# Altium PCB ESCapeBoard.PcbDoc
Units mm, origin at the board's own origin, x right, y up, seen from the top; angles counter-clockwise.
Board outline 52 x 30 mm, 4 copper layers (Top Layer, Layer 1, Layer 2, Bottom Layer), stack 0.603 mm thick; 61 components, 53 nets, 200 pads, 126 vias.
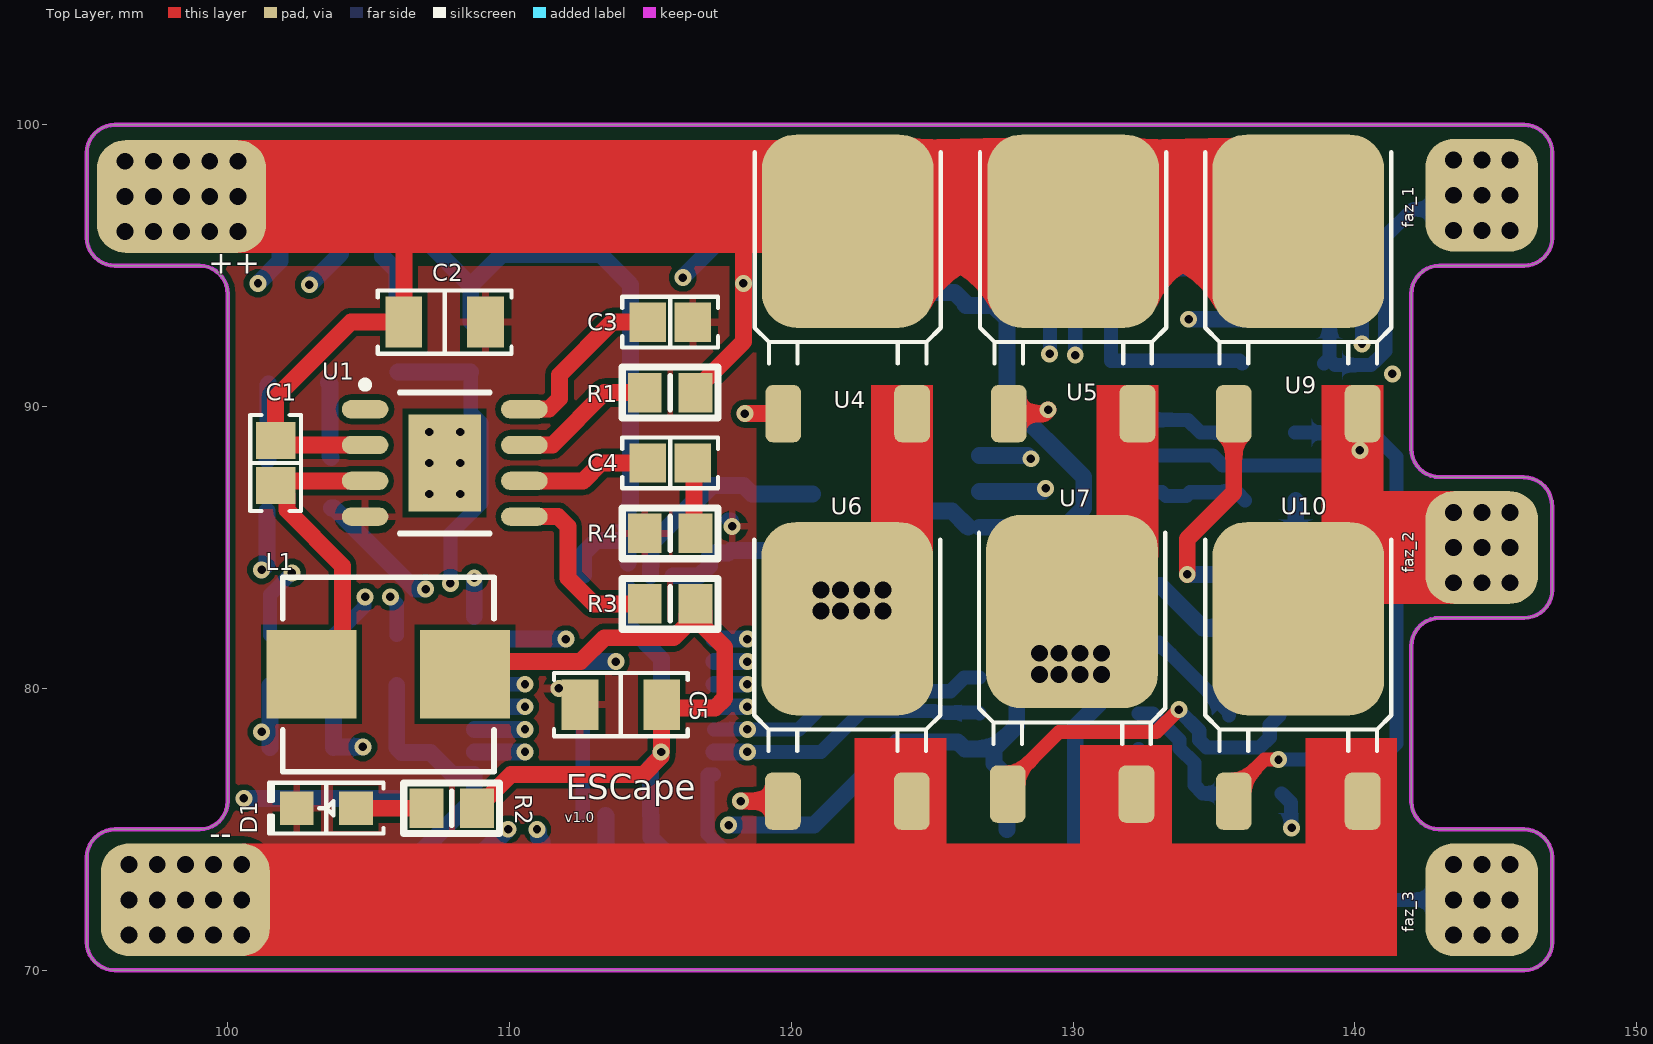
[diagram p0: Top Layer view]
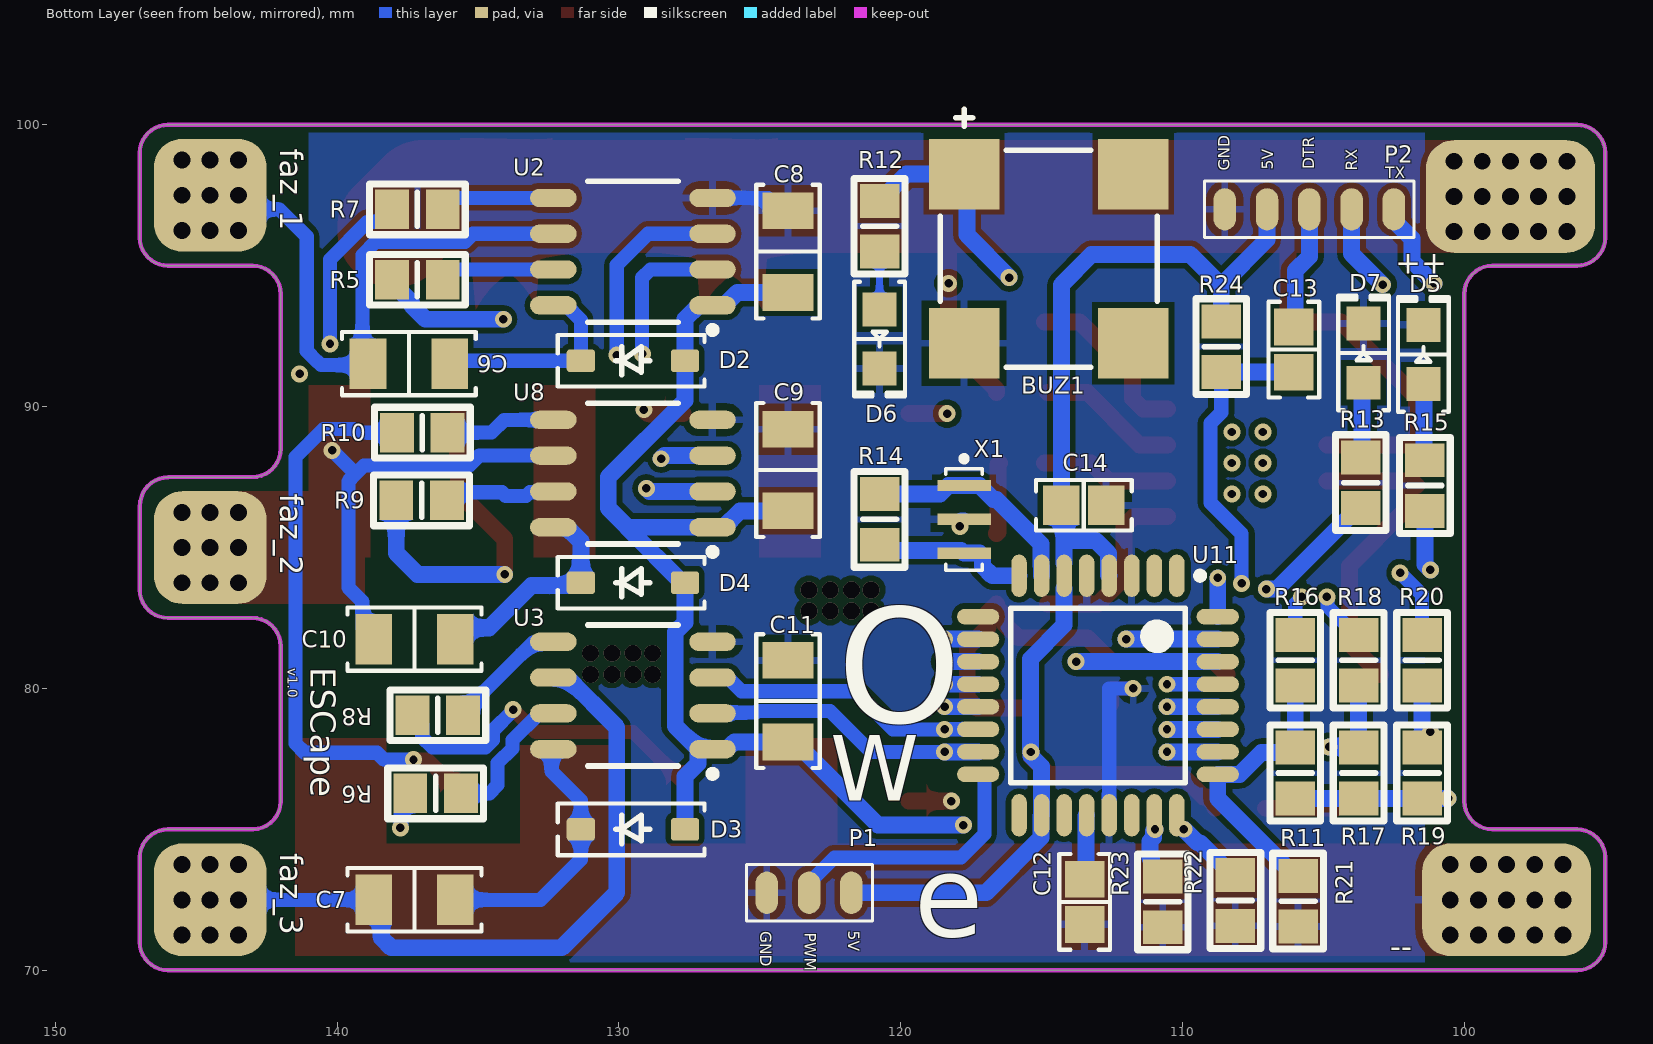
[diagram p1: Bottom Layer view, seen from below]
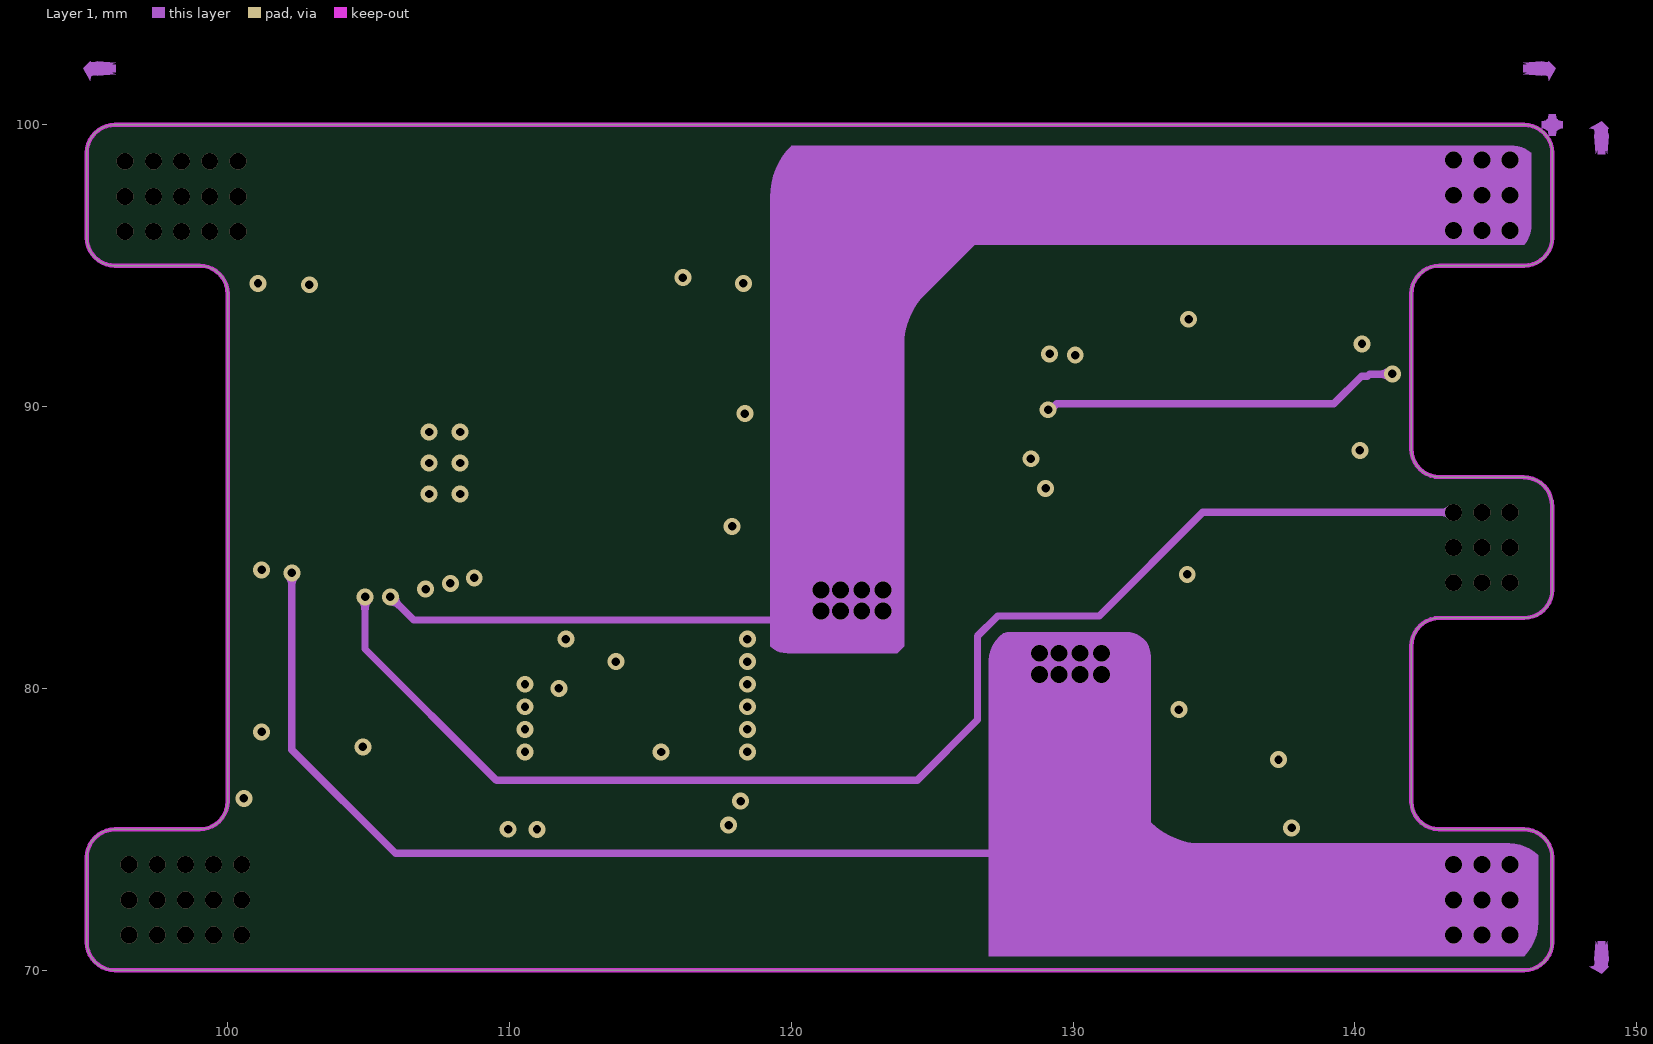
[diagram p2: Layer 1]
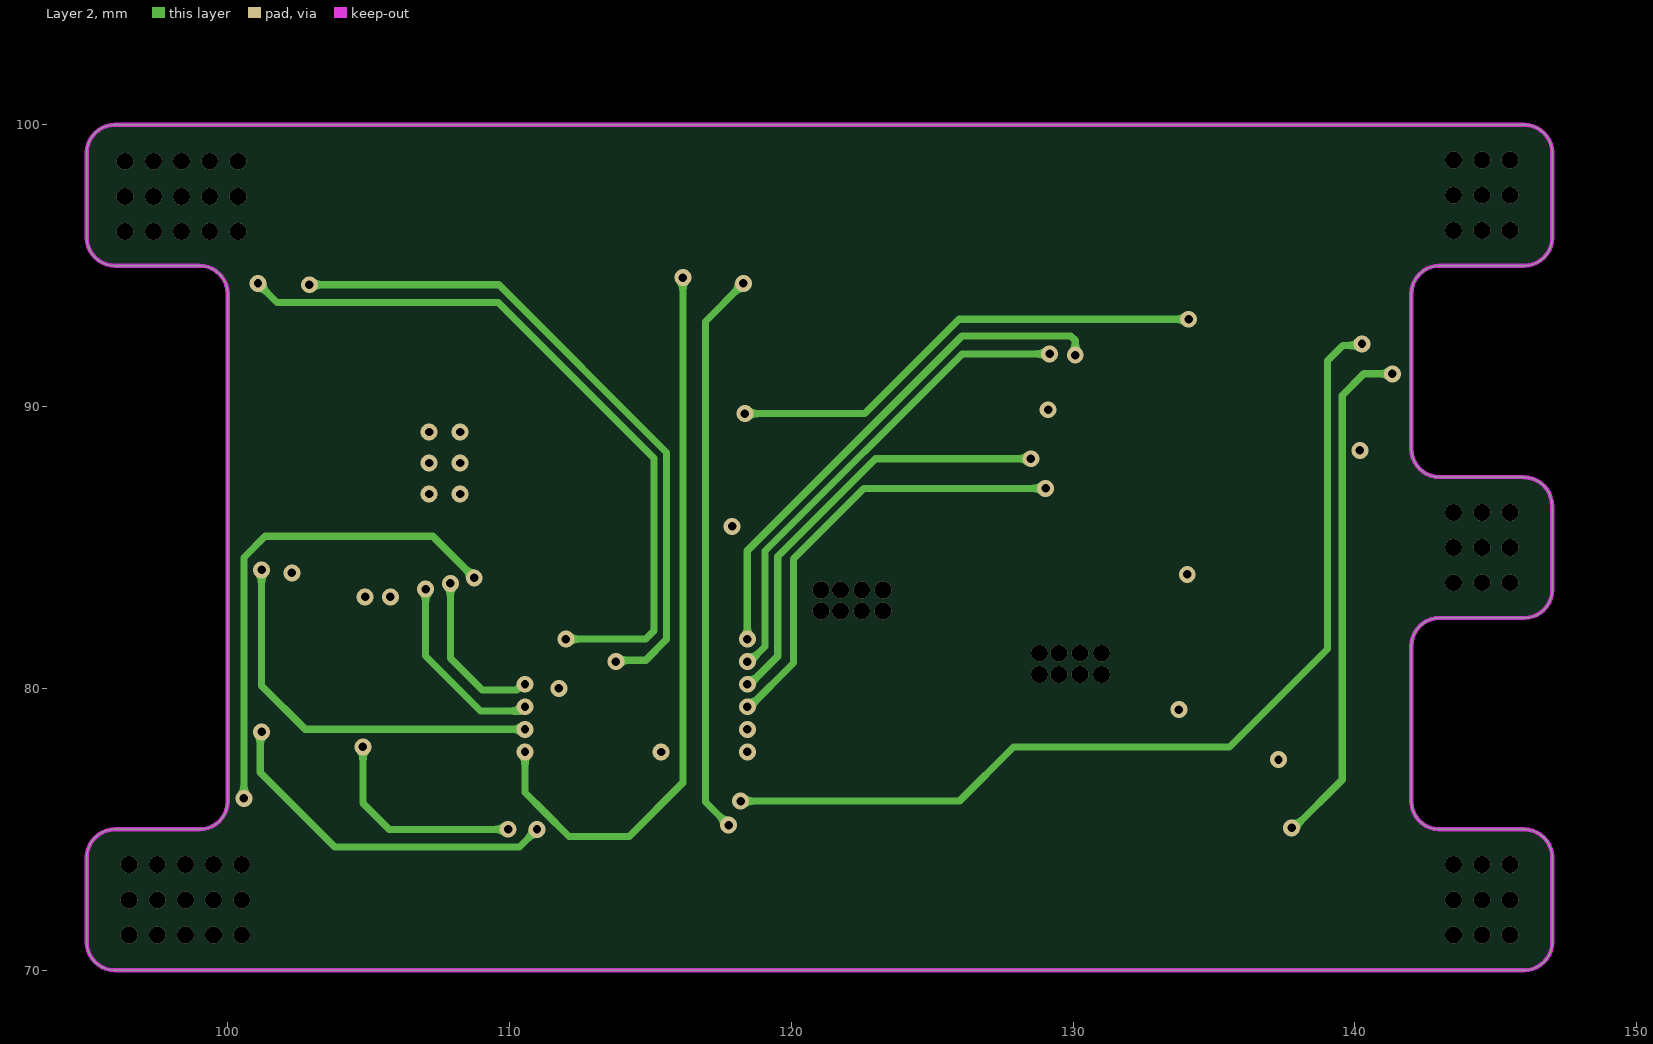
[diagram p3: Layer 2]
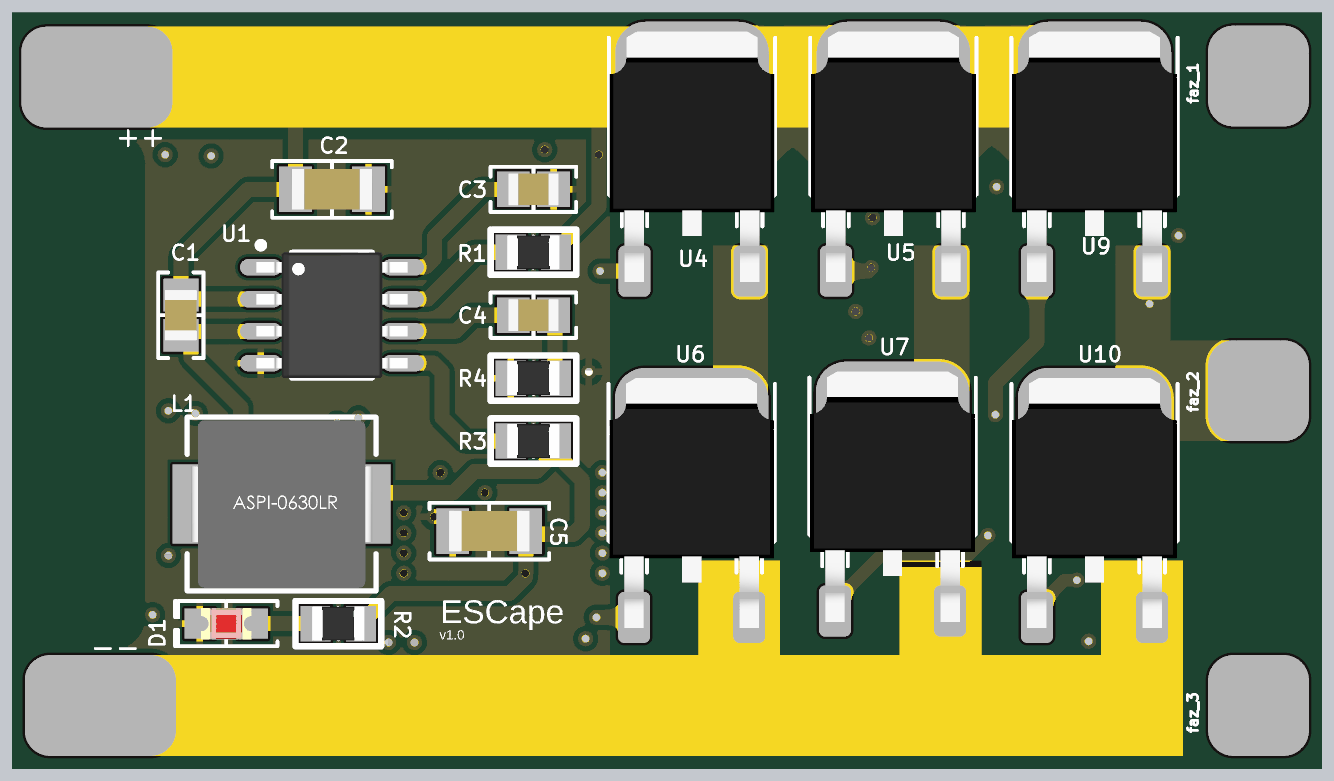
[diagram p4: 3D render of the assembled board from above, using the file's embedded part models]
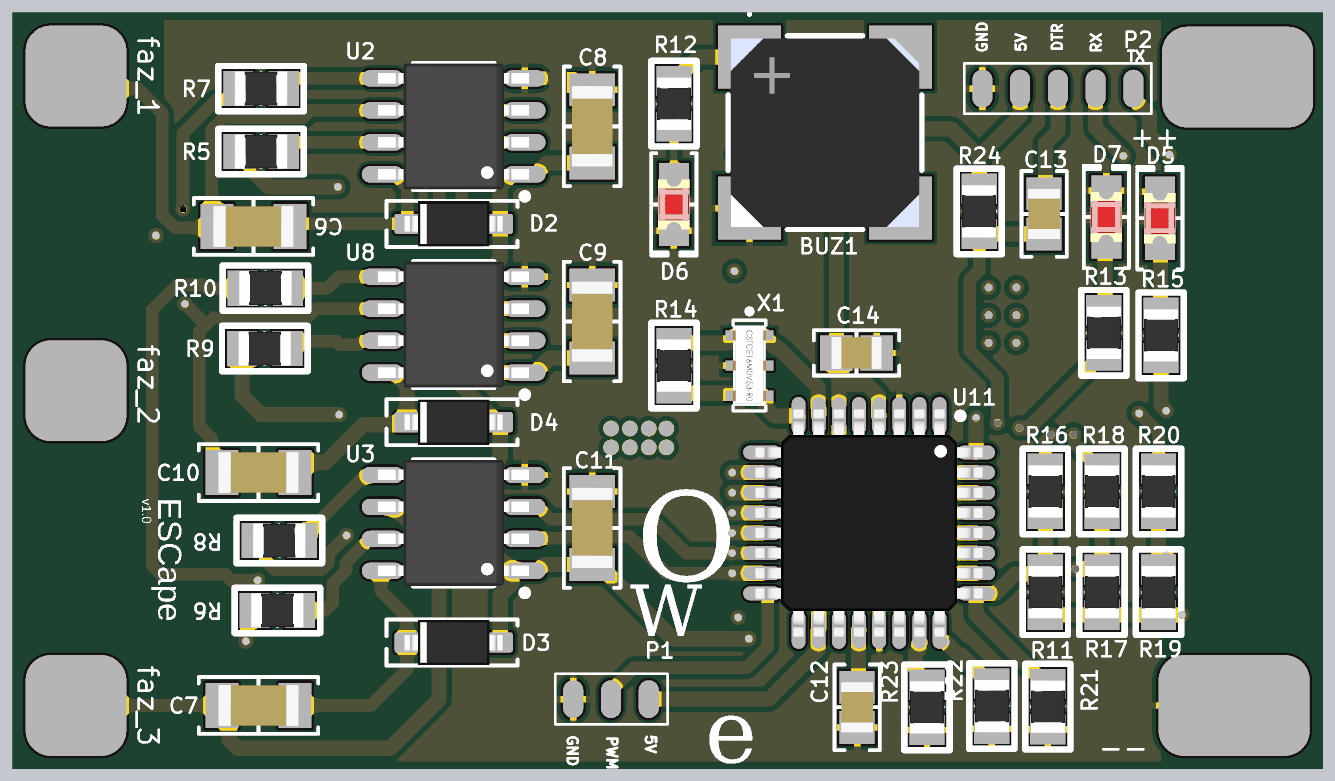
[diagram p5: 3D render of the assembled board from below, using the file's embedded part models]

## Layer stack, top to bottom
Top Solder: solder mask 0.0102, Solder Resist, Dk 3.5
Top Layer: signal copper 0.0356
Dielectric 2: prepreg 0.0711, PP-006, Dk 4.1
Layer 1: signal copper 0.035
Dielectric 1: dielectric 0.32, FR-4, Dk 4.8
Layer 2: signal copper 0.035
Dielectric 3: prepreg 0.0711, PP-006, Dk 4.1
Bottom Layer: signal copper 0.0356
Bottom Solder: solder mask 0.0102, Solder Resist, Dk 3.5

## Board outline
95,71 95,74 cw(c96,74) 96,75 99,75 ccw(c99,76) 100,76 100,94 ccw(c99,94) 99,95 96,95 cw(c96,96) 95,96 95,99 cw(c96,99) 96,100 146,100 cw(c146,99) 147,99 147,96 cw(c146,96) 146,95 143,95 ccw(c143,94) 142,94 142,88.501 ccw(c143,88.501) 143,87.501 143,87.5 145.991,87.5 145.991,87.491 cw(c145.991,86.491) 146.991,86.491 147,86.491 147,83.5 cw(c146,83.5) 146,82.5 143,82.5 ccw(c143,81.5) 142,81.5 142,75.976 ccw(c143,76) 142.976,75 146,75 cw(c146,74) 147,74 147,71 cw(c146,71) 146,70 96,70 cw(c96,71)

## Design rules (kind name [scope] priority, off if disabled: settings)
Clearance [All] p1: gap=0.2 ignorepadtopadclearanceinfootprint=FALSE except(0: Arc-Hole Track-Hole SMDPad-Hole THPad-Hole Via-Hole Fill-Hole Poly-Hole Region-Hole Text-Hole)
PolygonConnect [All] p1: connectstyle=Relief reliefconductorwidth=0.254 reliefentries=4 polygonreliefangle="90 Angle" airgapwidth=0.254
RoutingVias [All] p1: holewidth=0.3 width=0.6 viastyle="Through Hole" minholewidth=0.25 minwidth=0.5 maxholewidth=2.5 maxwidth=5
SolderMaskExpansion [All] p1: expansion=0.102 istentingtop=FALSE
SupplyNets "Schematic Supply Nets_2" [InNet('+5V')] p1: voltage=0.000
SupplyNets "Schematic Supply Nets_1" [InNet('GND')] p2: voltage=0.000
SupplyNets "Schematic Supply Nets" [InNet('VCC')] p3: voltage=0.000
Width [All] p1: maxlimit=10 minlimit=0.1 preferedwidth=0.3 midlayer1_minwidth=0.254 midlayer1_maxwidth=0.254 midlayer1_prefwidth=0.254 midlayer2_minwidth=0.254 midlayer2_maxwidth=0.254 midlayer2_prefwidth=0.254 minimp=50.000000 maximp=50.000000 favimp=50.000000
30 further rules are at their usual default settings.

## Classes and differential pairs
component class Power: C1 C2 C3 C4 C5 D1 L1 R1 R2 R3 R4 U1
component class MCU: BUZ1 C12 C13 C14 D5 D6 D7 P1 P2 R11 R12 R13 R14 R15 R16 R17 R18 R19 R20 R21 R22 R23 R24 U11 X1
component class Driver: C6 C7 C8 C9 C10 C11 D2 D3 D4 R5 R6 R7 R8 R9 R10 U2 U3 U4 U5 U6 U7 U8 U9 U10

## Components (designator, comment, footprint, x,y, rotation, side; value= is the part's Value field where it differs from the comment)
BUZ1 "BUZZER MAGN 3.6V 7.5X7.5MM SMD" "BUZ: CMT-7525" 114.75,95.25 r270 bottom
C1 "CAP CER 10000PF 50V X7R 0805" "CAP 0805/2012" 101.7,88 r270 top
C2 "CAP CER 10UF 50V X5R 1206" "CAP 1206/3216" 107.7,93 r180 top
C3 "CAP CER 0.1UF 50V X7R 0805" "CAP 0805/2012" 115.7,93 r180 top
C4 "CAP CER 3900PF 50V X7R 0805" "CAP 0805/2012" 115.7,88 r180 top
C5 "CAP CERAMIC 22UF 16V X7S 20% PAD" "CAP 1206/3216" 113.95,79.425 r0 top
C6 "CAP CER 2.2UF 50V X5R 1206" "CAP 1206/3216" 137.45,91.525 r0 bottom
C7 "CAP CER 2.2UF 50V X5R 1206" "CAP 1206/3216" 137.25,72.5 r0 bottom
C8 "CAP CER 10UF 50V X5R 1206" "CAP 1206/3216" 124,95.5 r270 bottom
C9 "CAP CER 10UF 50V X5R 1206" "CAP 1206/3216" 124,87.75 r270 bottom
C10 "CAP CER 2.2UF 50V X5R 1206" "CAP 1206/3216" 137.25,81.75 r0 bottom
C11 "CAP CER 10UF 50V X5R 1206" "CAP 1206/3216" 124,79.55 r270 bottom
C12 "CAP CER 0.1UF 50V X7R 0805" "CAP 0805/2012" 113.475,72.425 r270 bottom
C13 "CAP CER 0.1UF 50V X7R 0805" "CAP 0805/2012" 106.05,92.025 r270 bottom
C14 "CAP CER 0.1UF 50V X7R 0805" "CAP 0805/2012" 113.5,86.5 r180 bottom
D1 "Red 645nm LED Indication - Discrete 1.8V 0805" "SMD: LED 0805/2012 RED" 103.5,75.75 r180 top
D2 "1N4148 Diyot" SOD-123 129.5,91.629 r0 bottom
D3 "1N4148 Diyot" SOD-123 129.5,75 r0 bottom
D4 "1N4148 Diyot" SOD-123 129.5,83.75 r0 bottom
D5 "Red 645nm LED Indication - Discrete 1.8V 0805" "SMD: LED 0805/2012 RED" 101.45,91.85 r90 bottom
D6 "Red 645nm LED Indication - Discrete 1.8V 0805" "SMD: LED 0805/2012 RED" 120.75,92.4 r270 bottom
D7 "Red 645nm LED Indication - Discrete 1.8V 0805" "SMD: LED 0805/2012 RED" 103.575,91.9 r90 bottom
L1 "FIXED IND 10UH 4A 68 MOHM SMD" ASPI-0630LR-100M-T15 105.7,80.5 r0 top
P1 "WR-PHD 2.54 mm Angled Socket Header" PWM_CONN 123.25,72.75 r0 bottom
P2 "WR-PHD 2.54 mm Angled Socket Header" TTL_CONN_5 105.5,97 r0 bottom
R1 "RES SMD 100K OHM 1% 1/8W 0805" RES_0805 115.7,90.5 r0 top
R2 "RES SMD 100 OHM 1% 1/8W 0805" RES_0805 107.95,75.75 r180 top
R3 "RES SMD 44.2K OHM 1% 1/8W 0805" RES_0805 115.7,83 r0 top
R4 "RES SMD 6.8K OHM 1% 1/8W 0805" RES_0805 115.7,85.5 r0 top
R5 "RES SMD 100 OHM 1% 1/8W 0805" RES_0805 137.15,94.5 r0 bottom
R6 "RES SMD 100 OHM 1% 1/8W 0805" RES_0805 136.5,76.275 r0 bottom
R7 "RES SMD 100 OHM 1% 1/8W 0805" RES_0805 137.15,97 r0 bottom
R8 "RES SMD 100 OHM 1% 1/8W 0805" RES_0805 136.425,79.05 r0 bottom
R9 "RES SMD 100 OHM 1% 1/8W 0805" RES_0805 137,86.675 r0 bottom
R10 "RES SMD 100 OHM 1% 1/8W 0805" RES_0805 136.975,89.075 r0 bottom
R11 "RES SMD 33K OHM 1% 1/8W 0805" RES_0805 106,77 r90 bottom
R12 "RES SMD 100 OHM 1% 1/8W 0805" RES_0805 120.75,96.4 r90 bottom
R13 "RES SMD 100 OHM 1% 1/8W 0805" RES_0805 103.675,87.3 r90 bottom
R14 "RES SMD 10K OHM 1% 1/8W 0805" RES_0805 120.75,86 r270 bottom
R15 "RES SMD 100 OHM 1% 1/8W 0805" RES_0805 101.4,87.2 r90 bottom
R16 "RES SMD 33K OHM 1% 1/8W 0805" RES_0805 106,81 r90 bottom
R17 "RES SMD 33K OHM 1% 1/8W 0805" RES_0805 103.75,77 r90 bottom
R18 "RES SMD 33K OHM 1% 1/8W 0805" RES_0805 103.75,81 r90 bottom
R19 "RES SMD 33K OHM 1% 1/8W 0805" RES_0805 101.5,77 r90 bottom
R20 "RES SMD 33K OHM 1% 1/8W 0805" RES_0805 101.5,81 r90 bottom
R21 "RES SMD 10K OHM 1% 1/8W 0805" RES_0805 105.9,72.45 r90 bottom
R22 "RES SMD 10K OHM 1% 1/8W 0805" RES_0805 108.125,72.475 r90 bottom
R23 "RES SMD 10K OHM 1% 1/8W 0805" RES_0805 110.7,72.425 r90 bottom
R24 "RES SMD 10K OHM 1% 1/8W 0805" RES_0805 108.625,92.125 r90 bottom
U1 "IC REG BUCK ADJUSTABLE 3A 8SOIC" SOIC8_PAD 107.7,88 r0 top
U2 "IC GATE DRVR HALF-BRIDGE 8SOIC" SOIC8 129.5,95.5 r0 bottom
U3 "IC GATE DRVR HALF-BRIDGE 8SOIC" SOIC8 129.5,79.75 r0 bottom
U4 "MOSFET N-CH 30V 161A DPAK" DPAK 122.014,93.75 r90 top
U5 "MOSFET N-CH 30V 161A DPAK" DPAK 130.014,93.75 r90 top
U6 "MOSFET N-CH 30V 161A DPAK" DPAK 122,80 r90 top
U7 "MOSFET N-CH 30V 161A DPAK" DPAK 129.978,80.25 r90 top
U8 "IC GATE DRVR HALF-BRIDGE 8SOIC" SOIC8 129.5,87.625 r0 bottom
U9 "MOSFET N-CH 30V 161A DPAK" DPAK 138,93.75 r90 top
U10 "MOSFET N-CH 30V 161A DPAK" DPAK 138,80 r90 top
U11 "IC MCU 8BIT 32KB FLASH 32TQFP" TQFP32 113,79.75 r270 bottom
X1 "CERAMIC RES 16.0000MHZ 15PF SMD" CRYSTAL_16MHZ(CTSE16) 117.75,86 r270 bottom

## Footprints (in the part's own frame and the unit in brackets; to place one, negate y for a bottom-side part, rotate by r counter-clockwise, add the part's x,y. Pads: shape width x height; smd on the part's side, far side on the other; paste and mask are expansions set on the pad)
ASPI-0630LR-100M-T15 [mm]
  rect 3.2x3.15 smd: 1(-2.725,0) 2(2.725,0)
  silkscreen extent -3.75,-3.45 3.75,3.45, body extent -3.6,-3.32 3.6,3.33, height 3
"BUZ: CMT-7525" [mm]
  rect 2.5x2.5 smd: 0(-3,3) 0(3,3) 1(-3,-3) 2(3,-3)
  silkscreen extent -5.3,-3.85 3.85,3.85, body extent -3.75,-3.75 3.75,3.75, height 2.5
"CAP 0805/2012" [mm] "Chip Capacitor, 2-Leads, Body 2.00x1.20mm, IPC Medium Density"
  rect 1.3x1.4 smd: 1(-0.8,0) 2(0.8,0)
  silkscreen extent -1.7,-0.9 1.7,0.9, body extent -1,-0.64 1,0.64, height 1.26
"CAP 1206/3216" [mm] "Chip Capacitor, 2-Leads, Body 3.25x1.60mm, IPC Medium Density"
  rect 1.3x1.8 smd: 1(-1.45,0) 2(1.45,0)
  silkscreen extent -2.37,-1.12 2.37,1.12, body extent -1.6,-0.81 1.6,0.81, height 1.62
CRYSTAL_16MHZ(CTSE16) [mm]
  rect 0.4x1.9 smd: 1(-1.2,0) 2(0,0) 3(1.2,0)
  silkscreen extent -2.25,-0.65 1.8,0.65, body extent -1.6,-0.65 1.6,0.65, height 0.9
DPAK [mil] "D-PAK, 3-Pads, Body 6,47x6,54mm (max), IPC Medium Density"
  rrect40% 80x50 smd: 1(-157.48,90.55) 3(-157.48,-89.45)
  rrect40% 270x240 smd: 4(97.52,0.55)
  silkscreen extent -87,-129 208,131, body extent -174,-128 217,129, height 91
PWM_CONN [mm]
  oval 0.8x1.5 smd: 1(-1.5,0) 2(0,0) 3(1.5,0)
  silkscreen extent -2.25,-1 2.22,1
RES_0805 [mm]
  rect 1.2x1.4 smd: 1(-0.9,0) 2(0.9,0)
  silkscreen extent -1.7,-0.9 1.7,0.9, body extent -1.05,-0.68 1.05,0.68, height 0.6
"SMD: LED 0805/2012 RED" [mm] "Chip Diode, 2-Leads, Body 2.00x1.25mm, IPC Medium Density"
  rect 1.2x1.2 smd: 1(-1.05,0) 2(1.05,0)
  silkscreen extent -2.03,-0.9 2.03,0.9, body extent -1,-0.62 1,0.63, height 0.9
SOD-123 [mm] "SOD, 2-Leads, Body 1.55x3.70mm, IPC Medium Density"
  rrect25% 1x0.8 smd: 1(-1.85,0) 2(1.85,0)
  silkscreen extent -2.54,-0.92 2.67,0.92, body extent -1.95,-0.9 1.95,0.9, height 1.18
SOIC8 [mm] "SOIC, 8-Leads, Body 4,90x3,90mm, Pitch 1,27mm, Thermal Pad 3,45x2,56mm, IPC Low Density"
  oval 1.65x0.65 smd: 1(-2.825,1.905) 2(-2.825,0.635) 3(-2.825,-0.635) 4(-2.825,-1.905) 5(2.825,-1.905) 6(2.825,-0.635) 7(2.825,0.635) 8(2.825,1.905)
  silkscreen extent -2.95,-2.5 1.6,2.9, body extent -3,-2.5 3,2.5, height 1.7
SOIC8_PAD [mm] "SOIC, 8-Leads, Body 4,90x3,90mm, Pitch 1,27mm, Thermal Pad 3,45x2,56mm, IPC Low Density"
  oval 1.65x0.65 smd: 1(-2.825,1.905) 2(-2.825,0.635) 3(-2.825,-0.635) 4(-2.825,-1.905) 5(2.825,-1.905) 6(2.825,-0.635) 7(2.825,0.635) 8(2.825,1.905)
  rect 2.56x3.45 smd: 9(0,0)
  silkscreen extent -2.95,-2.5 1.6,2.9, body extent -3,-2.5 3,2.5, height 1.7
TQFP32 [mm] "TQFP, 32-Leads, Body 7,00x7,00mm, Pitch 0,80mm, IPC Medium Density"
  oval 1.5x0.55 smd: 1(-4.25,2.8) 2(-4.25,2) 3(-4.25,1.2) 4(-4.25,0.4) 5(-4.25,-0.4) 6(-4.25,-1.2) 7(-4.25,-2) 8(-4.25,-2.8) 17(4.25,-2.8) 18(4.25,-2) 19(4.25,-1.2) 20(4.25,-0.4) 21(4.25,0.4) 22(4.25,1.2) 23(4.25,2) 24(4.25,2.8)
  oval 0.55x1.5 smd: 9(-2.8,-4.25) 10(-2,-4.25) 11(-1.2,-4.25) 12(-0.4,-4.25) 13(0.4,-4.25) 14(1.2,-4.25) 15(2,-4.25) 16(2.8,-4.25) 25(2.8,4.25) 26(2,4.25) 27(1.2,4.25) 28(0.4,4.25) 29(-0.4,4.25) 30(-1.2,4.25) 31(-2,4.25) 32(-2.8,4.25)
  silkscreen extent -4.37,-3.1 3.1,3.75, body extent -4.51,-4.51 4.51,4.51, height 1
TTL_CONN_5 [mm]
  oval 0.8x1.5 smd: 1(-3,0) 2(-1.5,0) 3(0,0) 4(1.5,0) 5(3,0)
  silkscreen extent -3.71,-1 3.72,1

## Part data
BUZ1: library part Buzzer(CMT-7525-80-SMT-TR), "Buzzers Transducer, Externally Driven Magnetic 3.6V 100mA 2.73kHz 80dB @ 3.6V, 10cm Surface Mount Solder Pads", +Sicaklik=+85, -Sicaklik=-40, Cins=Buzzer, Deger=Buzzer, Kılıf=Nonstandard, Lehim Yöntemi=SMD, MSL="1 (Unlimited)", Uretici Kodu=CMT-7525-80-SMT-TR
C1: library part "10nF 50V 0805", "10000pF ±10% 50V Ceramic Capacitor X7R 0805 (2012 Metric)", +Sicaklik=+125, -Sicaklik=-55, Cins=Kondansator, Deger="10nF 50V", Kılıf=0805, Lehim Yöntemi=SMD, MSL="1 (Unlimited)", Uretici Kodu=CL21B103KBANNNC
C2 C8 C9 C11: library part "10uF 50V 1206", "10µF ±10% 50V Ceramic Capacitor X5R 1206 (3216 Metric)", +Sicaklik=+125, -Sicaklik=-55, Cins=Kondansator, Deger="10uF 50V", Kılıf=1206, Lehim Yöntemi=SMD, MSL="1 (Unlimited)", Uretici Kodu=CL31A106KBHNNNE
C3 C12 C13 C14: library part "100nF 50V 0805", "0.1µF ±10% 50V Ceramic Capacitor X7R 0805 (2012 Metric)", +Sicaklik=+125, -Sicaklik=-55, Cins=Kondansator, Deger="100nF 50V", Kılıf=0805, Lehim Yöntemi=SMD, MSL="1 (Unlimited)", Uretici Kodu=CL21B104KBCNNNC
C4: library part "3.9nF 50V 0805", "3900pF ±10% 50V Ceramic Capacitor X7R 0805 (2012 Metric)", +Sicaklik=+125, -Sicaklik=-55, Cins=Kondansator, Deger="3.9nF 50V", Kılıf=0805, Lehim Yöntemi=SMD, MSL="1 (Unlimited)", Uretici Kodu=CL21B392KBANNNC
C5: library part "22uF 16V 1206", "22µF ±20% 16V Ceramic Capacitor X7S 1206 (3216 Metric)", +Sicaklik=+125, -Sicaklik=-55, Cins=Kondansator, Deger="22uF 16V", Kılıf=1206, Lehim Yöntemi=SMD, MSL="1 (Unlimited)", Uretici Kodu=GRM31CC71C226ME11L
C6 C7 C10: library part "2.2uF 50V 1206", "2.2µF ±10% 50V Ceramic Capacitor X5R 1206 (3216 Metric)", +Sicaklik=+85, -Sicaklik=-55, Cins=Kondansator, Deger="2.2uF 50V", Kılıf=1206, Lehim Yöntemi=SMD, MSL="1 (Unlimited)", Uretici Kodu=CL31A225KBHNNNE
D1 D5 D6 D7: library part LED_Kırmızı, "LED RED DIFFUSED 0805 SMD", +Sicaklik=+125, -Sicaklik=-40, Cins=LED, Deger="KIRMIZI LED", Kılıf=0805, Lehim Yöntemi=SMD, MSL="1 (Unlimited)", Uretici Kodu="LH R974-LP-1"
D2 D3 D4: library part 1N4148, "DIODE GEN PURP 100V 150MA SOD123", +Sicaklik=+150, -Sicaklik=-65, Cins=Diyot, Deger=1N4148, Kılıf=SOD123, Lehim Yöntemi=SMD, MSL="1 (Unlimited)", Uretici Kodu=1N4148W-TP
L1: library part "10uH 4A", "10µH Shielded Molded Inductor 4A 68mOhm Max Nonstandard", +Sicaklik=+125, -Sicaklik=-55, Cins=Bobin, Deger="10uH 4A", Kılıf=Nonstandard, Lehim Yöntemi=SMD, MSL="1 (Unlimited)", Uretici Kodu=ASPI-0630LR-100M-T15
P1: library part HDR(1X3), +Sicaklik=+105, -Sicaklik=-40, Cins=Konnektor, Kılıf="3POS 2.54MM", Lehim Yöntemi=MANUEL, MSL="1 (Unlimited)", Uretici Kodu=613003143121
P2: library part HDR(1X5), +Sicaklik=+105, -Sicaklik=-40, Cins=Konnektor, Kılıf="5POS 2.54MM", Lehim Yöntemi=MANUEL, MSL="1 (Unlimited)", Uretici Kodu=613005143121
R1: library part "100K 0805", "100 kOhms ±1% 0.125W, 1/8W Chip Resistor 0805 (2012 Metric) Moisture Resistant Thick Film", +Sicaklik=+155, -Sicaklik=-55, Cins=Direnc, Deger=100K, Kılıf=0805, Lehim Yöntemi=SMD, MSL="1 (Unlimited)", Uretici Kodu=RC0805FR-07100KL
R2 R5 R6 R7 R8 R9 R10 R12 R13 R15: library part "100R 0805", "100 Ohms ±1% 0.125W, 1/8W Chip Resistor 0805 (2012 Metric) Moisture Resistant Thick Film", +Sicaklik=+155, -Sicaklik=-55, Cins=Direnc, Deger=100R, Kılıf=0805, Lehim Yöntemi=SMD, MSL="1 (Unlimited)", Uretici Kodu=RC0805FR-07100RL
R3: library part "44.2K 0805", "44.2 kOhms ±1% 0.125W, 1/8W Chip Resistor 0805 (2012 Metric) Moisture Resistant Thick Film", +Sicaklik=+155, -Sicaklik=-55, Cins=Direnc, Deger=44.2K, Kılıf=0805, Lehim Yöntemi=SMD, MSL="1 (Unlimited)", Uretici Kodu=RC0805FR-0744K2L
R4: library part "6.8K 0805", "6.8 kOhms ±1% 0.125W, 1/8W Chip Resistor 0805 (2012 Metric) Moisture Resistant Thick Film", +Sicaklik=+155, -Sicaklik=-55, Cins=Direnc, Deger=6.8K, Kılıf=0805, Lehim Yöntemi=SMD, MSL="1 (Unlimited)", Uretici Kodu=RC0805FR-076K8L
R11 R16 R17 R18 R19 R20: library part "33K 0805", "33 kOhms ±1% 0.125W, 1/8W Chip Resistor 0805 (2012 Metric) Moisture Resistant Thick Film", +Sicaklik=+155, -Sicaklik=-55, Cins=Direnc, Deger=33K, Kılıf=0805, Lehim Yöntemi=SMD, MSL="1 (Unlimited)", Uretici Kodu=RC0805FR-0733KL
R14 R21 R22 R23 R24: library part "10K 0805", "10 kOhms ±1% 0.125W, 1/8W Chip Resistor 0805 (2012 Metric) Moisture Resistant Thick Film", +Sicaklik=+155, -Sicaklik=-55, Cins=Direnc, Deger=10K, Kılıf=0805, Lehim Yöntemi=SMD, MSL="1 (Unlimited)", Uretici Kodu=RC0805FR-0710KL
U1: library part MP2307DN, "Buck Switching Regulator IC Positive Adjustable 0.925V 1 Output 3A 8-SOIC (0.154\", 3.90mm Width) Exposed Pad", +Sicaklik=+85, -Sicaklik=-40, Cins=IC, Deger=MP2307DN, Kılıf=8-SOIC, Lehim Yöntemi=SMD, MSL="2A (4 Weeks)", Uretici Kodu=MP2307DN-LF-Z
U2 U3 U8: library part IR2101, "Half-Bridge Gate Driver IC Non-Inverting 8-SOIC", +Sicaklik=+150, -Sicaklik=-40, Cins=IC, Deger=IR2101STRPBF, Kılıf=8-SOIC, Lehim Yöntemi=SMD, MSL="2A (4 Weeks)", Uretici Kodu=IR2101STRPBF
U4 U5 U6 U7 U9 U10: library part IRLR7843, "N-Channel 30V 161A (Tc) 140W (Tc) Surface Mount D-Pak", +Sicaklik=+175, -Sicaklik=-55, Cins=MOSFET, Deger=IRLR7843TRPBF, Kılıf=DPAK(TO-252-3), Lehim Yöntemi=SMD, MSL="1 (Unlimited)", Uretici Kodu=IRLR7843TRPBF
U11: library part ATMEGA328P, "AVR AVR® ATmega Microcontroller IC 8-Bit 20MHz 32KB (16K x 16) FLASH 32-TQFP (7x7)", +Sicaklik=+85, -Sicaklik=-40, Cins=IC, Deger=ATMEGA328P, Kılıf=32-TQFP, Lehim Yöntemi=SMD, MSL="3 (168 Hours)", Uretici Kodu=RC0805FR-07100RL
X1: library part "CRYSTAL 16.0000MHZ(CSTCE16M0V53-R0)", "16MHz Ceramic Resonator Built in Capacitor 15pF ±0.3%  -20°C ~ 80°C Surface Mount", +Sicaklik=+80, -Sicaklik=-20, Cins=Kristal, Deger="16 MHZ 15PF", Kılıf=3-SMD, Lehim Yöntemi=SMD, MSL="1 (Unlimited)", Uretici Kodu=CSTCE16M0V53-R0

## Free pads (board coordinates)
  rrect50% 6x4 smd: ""(98.362,97.458) ""(98.5,72.5)
  rrect50% 6x4 smd far side: ""(98.362,97.458) ""(98.5,72.5)
  rrect50% 4x4 smd: ""(144.5,72.5) ""(144.5,85) ""(144.5,97.5)
  rrect50% 4x4 smd far side: ""(144.5,72.5) ""(144.5,85) ""(144.5,97.5)

## Via types
v1: diameter 0.6, hole 0.6, Top Layer to Bottom Layer, 57 vias
v2: diameter 0.6, hole 0.3, Top Layer to Bottom Layer, tented both sides, 53 vias
v3: diameter 0.6, hole 0.6, Top Layer to Bottom Layer, tented both sides, 16 vias

## Nets (pads, with @x,y where several pads share a name; then routed paths per layer and width w, separated by ;. In a path a pad name is that pad's centre, name@x,y a point inside that pad or via, vN(x,y) a via of type N, cw(c..) or ccw(c..) an arc to the next point about the centre after c; other vN are vias at no path point)
+5V: C5.2 C14.1 L1.2 P1.1 P2.4 R2.1 R3.2 R24.2 U11.4 U11.6 U11.18 | length 65.6
  Top Layer w0.6: L1.2 108.875,80.95 112.525,80.95 113.375,81.8 115.825,81.8 116.3,82.275 116.3,82.6 116.488,82.788 116.812,82.788 R3.2 ; R2.1 108.85,75.85 109.15,76.15 109.25,76.15 110.05,76.95 114.75,76.95 115.381,77.581 v2(115.381,77.744) 115.4,77.763 C5.2 115.525,79.3 117.287,79.3 117.638,79.651 117.638,81.447 116.9,82.185 R3.2@116.9,82.7
  Bottom Layer w0.6: P2.4 107,95.925 108.625,94.3 ; R24.2 108.625,94.3 ; U11.4 112.625,84.025 112.625,84.796 113.079,85.25 114.15,85.25 114.2,85.2 ; U11.6@114.2,83.55 114.2,82.25 115.4,81.05 115.4,77.763 v2(115.381,77.744) 115.381,77.608 115,77.227 U11.18 115.025,75.475 115.025,74.704 116.979,72.75 P1.1 ; U11.6@114.2,84.45 114.2,85.2 ; 108.625,94.3 109.725,95.4 113.225,95.4 114.3,94.325 C14.1 114.2,86.4 114.2,85.2
A0: R19.2 R20.1 R23.2 U11.23 | length 16.9
  Layer 2 w0.254: v2(101.202,78.456) 101.155,78.409 101.155,77.02 103.8,74.375 110.35,74.375 v2(110.975,75)
  Bottom Layer w0.6: v2(101.202,78.456) 101.5,78.456 R19.2 ; 101.5,78.64 R20.1 ; R23.2@110.725,73.35 110.825,73.35 111.1,73.625 111.1,73.926 111.15,73.976 111.15,74.579 111.025,74.704 111.025,74.95 v2(110.975,75)
A1: R17.2 R18.1 R22.2 U11.24 | length 13.3
  Layer 2 w0.254: v2(104.8,77.923) 104.8,75.925 105.725,75 v2(109.948,75.002) v2(109.948,75.002)
  Bottom Layer w0.6: R17.2 R17.2@103.75,77.923 ; R18.1 R17.2@103.75,77.923 ; v2(104.8,77.923) R17.2@103.75,77.923 ; R22.2 108.225,73.375 109.374,74.524 109.469,74.524 v2(109.948,75.002)
A2: R11.2 R16.1 R21.2 U11.25 | length 10.2
  Bottom Layer w0.6: R21.2 106,73.35 108.75,76.1 U11.25 107.979,76.95 107.201,77.728 106.172,77.728 R11.2 106,79.177 R16.1
BUZZ: BUZ1.1 R12.2 U11.26 | length 36
  Layer 2 w0.254: v2(110.55,77.75) 110.55,76.311 111.234,75.627 112.111,74.75 114.25,74.75 116.15,76.65 v2(116.15,94.575)
  Bottom Layer w0.6: U11.26 v2(110.55,77.75) ; v2(116.15,94.575) 116.15,94.6 117.65,96.1 117.65,98.15 BUZ1.1 119.8,98.25 120.35,97.7 120.35,97.6 120.65,97.3 R12.2
DTR: C13.1 P2.3 | length 4.4
  Bottom Layer w0.6: P2.3 105.5,95.325 106,94.825 106,92.875 C13.1
FAZ_1: C6.2 pad.@144.5,97.5 R16.2 U2.6 U4.3 U6.4 | length 36.1
  Layer 1 w0.254: v2(105.775,83.25) 106.6,82.425 119.592,82.425
  Bottom Layer w0.5: v2(105.775,83.25) 105.775,83.223 106,82.998 R16.2 ; U2.6 135.179,96.135 135.464,95.85 138.636,95.85 139.1,95.386 139.1,91.725 C6.2@138.982,91.607 ; C6.2 C6.2@138.982,91.607 ; v1(143.5,97.5) 143.001,97.001 142.043,97.001 141.075,96.033 141.075,91.975 140.707,91.607 140.693,91.607 140.561,91.475 139.3,91.475 139.168,91.607 C6.2@138.982,91.607
  other v1: 143.5,96.25 144.5,96.25 145.5,96.25 144.5,97.5 145.5,97.5 143.5,98.75 144.5,98.75 145.5,98.75
  other v3: 121.05,82.75 121.75,82.75 122.5,82.75 123.25,82.75 121.05,83.5 121.75,83.5 122.5,83.5 123.25,83.5
FAZ_2: C10.2 pad.@144.5,85 R18.2 U8.6 U9.3 U10.4 | length 64.8
  Layer 1 w0.254: v2(104.875,83.25) 104.875,81.4 109.533,76.742 124.467,76.742 126.6,78.875 126.6,81.85 127.325,82.575 130.925,82.575 134.6,86.25 v1(143.5,86.25)
  Bottom Layer w0.5: R18.2 103.768,81.9 104.118,82.25 104.2,82.25 104.856,82.906 104.856,83.231 v2(104.875,83.25) ; U8.6 133.639,88.26 134.954,88.26 135.307,87.906 139.044,87.906 139.322,87.628 ; C10.2 139.1,82.15 139.1,83.077 139.6,83.577 139.6,87.35 139.322,87.628 ; v2(140.175,88.45) 139.353,87.628 139.322,87.628
  other v1: 143.5,83.75 144.5,83.75 145.5,83.75 143.5,85 144.5,85 145.5,85 144.5,86.25 145.5,86.25
FAZ_3: C7.2 pad.@144.5,72.5 R20.2 U3.6 U5.3 U7.4 | length 62.2
  Layer 1 w0.254: v2(102.275,84.1) 102.275,77.825 105.95,74.15 129.699,74.15
  Bottom Layer w0.5: R20.2 101.5,83.325 v2(102.275,84.1) ; C7.2 v1(143.5,72.5)
  Bottom Layer w0.6: U3.6 131.839,80.385 130.075,78.621 130.075,72.75 132.025,70.8 138.074,70.8 138.426,71.151 138.426,72.226 C7.2
  other v1: 143.5,71.25 144.5,71.25 145.5,71.25 144.5,72.5 145.5,72.5 143.5,73.75 144.5,73.75 145.5,73.75
  other v3: 128.8,80.5 129.5,80.5 130.25,80.5 131,80.5 128.8,81.25 129.5,81.25 130.25,81.25 131,81.25
GND: BUZ1.2 C2.1 C3.1 C5.1 C8.1 C9.1 C11.1 C12.2 C14.2 D1.2 D5.2 D6.2 D7.2 P1.3 P2.5 pad.@98.5,72.5 R4.1 R21.1 R22.1 R23.1 U1.4 U2.4 U3.4 U6.3 U7.3 U8.4 U10.3 U11.3 U11.5 U11.21 X1.2 | length 9.9
  Top Layer w0.5: v2(111.75,80) 112.5,80 C5.1
  Bottom Layer w0.5: v2(111.75,80) 112.6,80 U11.21 ; X1.2 117.85,86 117.9,85.95 v2(117.9,85.75) ; C8.1 124.25,96.95 124.705,97.405 U2.4
  other v1: 96.5,71.25 97.5,71.25 98.5,71.25 99.5,71.25 100.5,71.25 96.5,72.5 97.5,72.5 98.5,72.5 99.5,72.5 100.5,72.5 96.5,73.75 97.5,73.75 98.5,73.75 99.5,73.75 100.5,73.75
H_1: U2.2 U11.11 | length 23.7
  Layer 2 w0.254: v2(118.438,80.95) 118.525,80.95 119.065,81.49 119.065,84.873 126.062,91.87 v2(129.167,91.87)
  Bottom Layer w0.5: U2.2 128.882,94.865 129.175,94.572 129.175,91.878 v2(129.167,91.87)
  Bottom Layer w0.6: U11.11 v2(118.438,80.95)
H_2: U8.2 U11.13 | length 19.5
  Layer 2 w0.254: v2(118.438,79.35) 118.525,79.35 120.075,80.9 120.075,84.599 122.576,87.1 v2(129.025,87.1)
  Bottom Layer w0.6: U11.13 v2(118.438,79.35) ; U8.2 128.915,86.99 v2(129.025,87.1)
H_3: U3.2 U11.15 | length 10.1
  Bottom Layer w0.5: v2(118.438,77.75) 121.051,77.75 122.501,79.2 125.086,79.2 125.143,79.144 126.646,79.144 U3.2
  Bottom Layer w0.6: U11.15 v2(118.438,77.75)
L_1: U2.3 U11.10 | length 26.8
  Layer 2 w0.254: v2(118.438,81.75) 118.438,84.888 126.05,92.5 129.926,92.5 130.075,92.351 v2(130.075,91.825)
  Bottom Layer w0.5: U2.3 128.965,96.135 130.075,95.025 v2(130.075,91.825)
  Bottom Layer w0.6: U11.10 v2(118.438,81.75)
L_2: U8.3 U11.12 | length 18.5
  Layer 2 w0.254: v2(118.438,80.15) 118.525,80.15 119.519,81.144 119.519,84.685 122.984,88.15 v2(128.5,88.15)
  Bottom Layer w0.6: U11.12 v2(118.438,80.15) ; U8.3 128.39,88.26 v2(128.5,88.15)
L_3: U3.3 U11.14 | length 10.2
  Bottom Layer w0.5: U11.14 v2(118.438,78.55) 120.275,78.55 121.625,79.9 125.649,79.9 126.134,80.385 U3.3
LED_1: R15.1 U11.27 | length 18.1
  Layer 2 w0.254: v2(101.202,84.204) 101.202,80.098 102.75,78.55 v2(110.55,78.55)
  Bottom Layer w0.6: v2(101.202,84.204) 101.4,84.402 R15.1 ; U11.27 v2(110.55,78.55)
LED_2: R13.1 U11.28 | length 13.1
  Layer 2 w0.254: v2(107.024,83.526) 107.024,81.151 108.975,79.2 110.306,79.2 110.456,79.35 v2(110.55,79.35)
  Bottom Layer w0.6: R13.1 103.775,86.4 106.649,83.526 v2(107.024,83.526) ; U11.28 v2(110.55,79.35)
NetC1_1: U1.1
NetC1_2: C1.2 L1.1 U1.3 | length 11.4
  Top Layer w0.6: L1.1@103,80.5 L1.1 104.075,81.6 104.075,84.35 102.1,86.325 102.1,86.85 101.75,87.2 C1.2 101.855,87.355 104.865,87.355 U1.3
NetC3_2: C3.2 U1.8 | length 6.2
  Top Layer w0.6: U1.8 110.535,89.915 111.408,89.915 111.775,90.281 111.775,91.128 113.647,93 C3.2
NetC4_1: C4.1 R4.2 | length 2.5
  Top Layer w0.6: C4.1 116.55,87.95 116.55,85.55 R4.2
NetC4_2: C4.2 U1.6 | length 4.6
  Top Layer w0.6: U1.6 112.615,87.365 113.25,88 C4.2
NetC6_1: C6.1 D2.2 U2.8 | length 7.3
  Bottom Layer w0.5: U2.8 131.866,93.595 131.35,93.079 D2.2 135.896,91.629 C6.1
NetC7_1: C7.1 D3.2 U3.8 | length 9.4
  Bottom Layer w0.5: U3.8 132.388,77.782 132.388,77.063 131.35,76.025 131.35,73.925 132.775,72.5 C7.1
NetC10_1: C10.1 D4.2 U8.8 | length 8
  Bottom Layer w0.6: U8.8 131.839,85.72 131.35,85.231 D4.2 131.45,83.65 133.1,83.65 134.601,82.149 135.45,82.149 135.8,81.799 C10.1
NetC12_1: C12.1 U11.20 | length 2.3
  Bottom Layer w0.6: U11.20 113.425,75.475 113.425,73.275 C12.1
NetD1_1: D1.1 R2.2 | length 2.5
  Top Layer w0.6: D1.1 R2.2
NetD5_1: D5.1 R15.2 | length 2.7
  Bottom Layer w0.6: R15.2 101.425,88.125 101.425,90.775 D5.1
NetD6_1: D6.1 R12.1 | length 2.1
  Bottom Layer w0.254: D6.1 R12.1
NetD7_1: D7.1 R13.2 | length 2.7
  Bottom Layer w0.6: D7.1 103.625,90.8 103.625,88.25 R13.2
NetR1_1: R1.1 U1.7 | length 5
  Top Layer w0.6: U1.7 110.535,88.645 111.52,88.645 113.375,90.5 R1.1
NetR3_1: R3.1 U1.5 | length 6.6
  Top Layer w0.6: U1.5 111.725,86.095 112.076,85.744 112.076,83.924 113,83 R3.1
NetR5_1: R5.1 U2.7 | length 4.1
  Bottom Layer w0.5: U2.7 135.9,94.865 136.25,94.515 R5.1
NetR5_2: R5.2 U4.1 | length 23.2
  Top Layer w0.6: v2(118.35,89.75) U4.1
  Layer 2 w0.254: v2(118.35,89.75) 122.6,89.75 125.95,93.1 v2(134.1,93.1)
  Bottom Layer w0.6: v2(134.1,93.1) 136.857,93.1 137.35,93.593 137.35,93.7 138.05,94.4 R5.2
NetR6_1: R6.1 U3.7 | length 5.1
  Bottom Layer w0.5: U3.7 132.825,79.115 133.775,78.165 133.775,77.874 134.3,77.349 134.3,76.568 134.593,76.275 R6.1
NetR6_2: R6.2 U5.1 | length 33.8
  Top Layer w0.6: U5.1 128.975,89.75 v2(129.114,89.889)
  Layer 1 w0.254: v2(129.114,89.889) 129.208,89.889 129.419,90.1 139.25,90.1 140.229,91.079 140.446,91.079 140.517,91.15 141.31,91.15 v2(141.325,91.164)
  Layer 2 w0.254: v2(137.75,75.05) 137.837,75.05 139.548,76.761 139.548,90.398 140.314,91.164 v2(141.325,91.164)
  Bottom Layer w0.5: R6.2 137.731,75.944 137.731,75.069 v2(137.75,75.05)
NetR7_1: R7.1 U2.5 | length 4.1
  Bottom Layer w0.5: U2.5 135.9,97.405 136.25,97.055 R7.1
NetR7_2: R7.2 U6.1 | length 42.3
  Top Layer w0.6: v2(118.2,76) U6.1
  Layer 2 w0.254: v2(118.2,76) 125.959,76 127.88,77.921 135.546,77.921 139.025,81.4 139.025,91.625 139.569,92.169 140.194,92.169 v2(140.25,92.225)
  Bottom Layer w0.5: R7.2 138.05,96.9 138.4,96.55 138.926,96.55 140.25,95.226 v2(140.25,92.225)
NetR8_1: R8.1 U3.5 | length 4.3
  Bottom Layer w0.5: U3.5 132.354,81.626 133.049,81.626 135.525,79.15 R8.1
NetR8_2: R8.2 U7.1 | length 12.6
  Top Layer w0.5: U7.1 127.678,76.631 129.497,78.45 132.95,78.45 v2(133.75,79.25)
  Bottom Layer w0.5: v2(133.75,79.25) 133.75,79.223 134.475,78.499 134.475,78.164 134.739,77.9 136.614,77.9 136.975,78.261 136.975,78.7 R8.2
NetR9_1: R9.1 U8.7 | length 4
  Bottom Layer w0.5: U8.7 132.354,86.961 133.153,86.961 133.289,86.825 134.014,86.825 134.15,86.961 135.814,86.961 R9.1
NetR9_2: R9.2 U9.1 | length 12.4
  Top Layer w0.6: v2(134.05,84.05) 134.05,85.3 135.7,86.95 U9.1
  Bottom Layer w0.6: v2(134.05,84.05) 137.15,84.05 137.9,84.8 R9.2
NetR10_1: R10.1 U8.5 | length 3.9
  Bottom Layer w0.5: U8.5 134.068,89.53 134.523,89.075 R10.1
NetR10_2: R10.2 U10.1 | length 21.1
  Top Layer w0.5: U10.1 135.7,76.381 136.791,77.472 137.283,77.472 v2(137.286,77.475)
  Bottom Layer w0.5: v2(137.286,77.475) 138.341,77.475 138.586,77.719 141.144,77.719 141.475,78.05 141.475,88.211 140.486,89.2 139.418,89.2 139.293,89.075 R10.2
PD2: R11.1 R17.1 R19.1 U11.32 | length 24.4
  Layer 2 w0.254: v2(100.575,76.1) 100.575,84.649 101.326,85.4 107.275,85.4 v2(108.75,83.925)
  Bottom Layer w0.6: v2(100.575,76.1) R19.1 R17.1 R11.1 ; U11.32 v2(108.75,83.925)
PWM: P1.2 U11.16 | length 9.6
  Bottom Layer w0.5: U11.16 117.048,76.95 117.025,76.927 117.025,74.839 117.866,73.998 122.352,73.998 123.25,73.1 P1.2
RESET: C13.2 R24.1 U11.29 | length 18.3
  Layer 2 w0.254: v2(107.9,83.725) 107.9,81.075 109.025,79.95 110.256,79.95 110.456,80.15 v2(110.55,80.15)
  Bottom Layer w0.5: v2(107.9,83.725) 107.9,85.489 109,86.589 109,89.411 108.625,89.786 R24.1 ; U11.29 v2(110.55,80.15)
  Bottom Layer w0.6: C13.2 R24.1
RX: P2.2 U11.30 | length 32.1
  Layer 2 w0.254: v2(102.9,94.325) 109.625,94.325 115.575,88.375 115.575,81.742 114.833,81 113.825,81 v2(113.775,80.95)
  Bottom Layer w0.6: v2(102.9,94.325) 104,95.425 P2.2 ; U11.30 v2(113.775,80.95)
TX: P2.1 U11.31 | length 32.5
  Layer 2 w0.254: v2(101.075,94.375) 101.752,93.698 109.598,93.698 115.121,88.175 115.121,82.037 114.834,81.75 v2(112,81.75)
  Bottom Layer w0.6: v2(101.075,94.375) 101.862,95.162 101.862,95.958 102.5,96.596 P2.1 ; U11.31 v2(112,81.75)
VCC: C1.1 C2.2 C8.2 C9.2 C11.2 D2.1 D3.1 D4.1 pad.@98.362,97.458 R1.2 U1.2 U2.1 U3.1 U4.4 U5.4 U8.1 U9.4 | length 122.3
  Top Layer w0.6: U1.2 104.865,88.645 101.855,88.645 C1.1 101.7,90.325 104.375,93 C2.2 106.25,97.379 106.172,97.458 ; R1.2 116.6,90.6 118.302,92.302 118.302,94.373 v2(118.3,94.375) 118.302,94.377 118.302,97.458
  Top Layer w4: v1(100.362,97.458) 106.172,97.458 118.302,97.458 136.938,97.458 137.986,96.41 U9.4
  Layer 2 w0.254: v2(117.775,75.15) 116.95,75.975 116.95,93.025 v2(118.3,94.375)
  Bottom Layer w0.6: v2(117.775,75.15) 120.8,75.15 123.75,78.1 C11.2 125.906,78.1 126.161,77.845 U3.1 127.175,77.845 128,78.67 128,81.997 127.65,82.347 D4.1 ; C9.2 125.698,86.3 U8.1@126.278,85.72 ; C8.2 125.8,94.05 126.165,93.685 126.165,93.618 126.189,93.595 U2.1 127.161,93.595 127.65,93.106 D2.1 127.65,90.222 130.375,87.497 130.375,86.4 129.695,85.72 U8.1 ; U3.1@127.161,77.845 127.185,77.822 127.185,77.335 127.65,76.87 D3.1 ; D4.1@127.75,83.75 129.678,85.678
  other v1: 96.362,96.208 97.362,96.208 98.362,96.208 99.362,96.208 100.362,96.208 96.362,97.458 97.362,97.458 98.362,97.458 99.362,97.458 96.362,98.708 97.362,98.708 98.362,98.708 99.362,98.708 100.362,98.708
X1: R14.1 U11.7 X1.1 | length 7.8
  Bottom Layer w0.6: U11.7 115,84.331 115.025,84.356 115.025,85.132 116.593,86.7 116.7,86.7 117.2,87.2 X1.1 118.3,87.2 118.6,86.9 R14.1
X2: R14.2 U11.8 X1.3 | length 5.6
  Bottom Layer w0.6: U11.8 116.749,84 117.1,84.351 117.1,84.7 117.2,84.8 X1.3 117.85,84.9 120.55,84.9 R14.2
pads on no net: BUZ1.0 U1.9 U11.1 U11.2 U11.9 U11.17 U11.19 U11.22
copper on no net:
  other v2: 107.15,86.9 108.25,86.9 107.15,88 108.25,88 107.15,89.1 108.25,89.1

## Polygon pours and split planes (outlines as drawn)
GND on Bottom Layer "GND_L04_P000" (solid, remove dead copper, pour order 0): 101.4,100 141,100 141,70 101.4,70
GND on Top Layer "GND_L01_P003" (solid, remove dead copper, pour order 3): 99.194,94.976 118.75,94.976 118.75,73.75 99.098,73.75 99.098,94.995

## Keep-outs
Keep-Out Layer:
  lines w0.15: 143,87.5 145.991,87.5 ; 143,87.501 cw(c143,88.501) 142,88.501 142,94 cw(c143,94) 143,95 146,95 ccw(c146,96) 147,96 147,99 ccw(c146,99) 146,100 96,100 ccw(c96,99) 95,99 95,96 ccw(c96,96) 96,95 99,95 cw(c99,94) 100,94 100,76 cw(c99,76) 99,75 96,75 ccw(c96,74) 95,74 95,71 ccw(c96,71) 96,70 146,70 ccw(c146,71) 147,71 147,74 ccw(c146,74) 146,75 145.984,75 142.976,75 cw(c143,76) 142,75.976 142,81.5 cw(c143,81.5) 143,82.5 146,82.5 ccw(c146,83.5) 147,83.5 147,86.491 ; 145.991,87.491 cw(c145.991,86.491) 146.991,86.491

## Other copper
Top Layer:
  rectangle net FAZ_2: 139,83 144.75,87
  rectangle net FAZ_3: 130.825,84.65 133.025,90.775
  rectangle net GND: 130.25,70.5 133.5,78
  rectangle net GND: 138.25,70.5 141.5,78.25
  rectangle net GND: 122.25,70.5 125.5,78.25
  rectangle net GND: 100.5,70.5 141.5,74.5
  rectangle net FAZ_1: 122.825,84.65 125.025,90.775
  rectangle net FAZ_2: 138.811,84.65 141.011,90.775
Layer 1:
  region net FAZ_1: 124,81.5 124,92.198 cw(c126.54,92.198) 124.744,93.994 126.5,95.75 146,95.75 ccw(c145.396,96.354) 146.25,96.354 146.25,99 ccw(c145.646,98.396) 145.646,99.25 120,99.25 119.994,99.244 ccw(c121.79,97.448) 119.25,97.448 119.25,81.5 ccw(c119.854,82.104) 119.854,81.25 123.75,81.25
  region net FAZ_3: 127.646,82 131.896,82 cw(c131.897,81.147) 132.5,81.75 cw(c131.897,81.147) 132.75,81.146 132.75,75.25 132.756,75.244 ccw(c134.552,77.04) 134.552,74.5 145.491,74.5 cw(c145.491,73.073) 146.5,74.082 146.5,71.707 cw(c144.793,71.707) 146,70.5 127,70.5 127,80.793 cw(c128.306,80.907) 127.517,81.954

## Silkscreen, mask and mechanical layers (free items; w line width, h text height)
Top Overlay:
  text "faz_1" at 142.083,96.35 h0.4 r90
  text "++" at 101.15,94.717 h0.8
  text "faz_2" at 142.083,84.1 h0.4 r90
  text "ESCape" at 112,75.766 h1.5
  text "v1.0" at 111.967,75.123 h0.6
  text "--" at 100.15,74.45 h0.8
  text "faz_3" at 142.083,71.35 h0.4 r90
Bottom Overlay:
  text "faz_1" at 142.017,99.15 h0.8 r90
  text "DTR" at 105.333,98.431 h0.4 r270
  text "5V" at 106.776,98.403 h0.4 r270
  text "RX" at 103.79,98.367 h0.4 r270
  text "GND" at 108.319,98.376 h0.4 r270
  text "TX" at 102.805,98.1 h0.4
  text "++" at 100.6,94.717 h0.8
  text "faz_2" at 142.017,86.9 h0.8 r90
  text "ESCape" at 141.234,80.75 h1.5 r90
  text "v1.0" at 141.877,80.717 h0.6 r90
  text "O" at 122.256,77.454 h7
  text "W" at 122.5,75.25 h4
  text "faz_3" at 142.017,74.15 h0.8 r90
  text "5V" at 121.868,71.394 h0.4 r90
  text "GND" at 124.975,71.378 h0.4 r90
  text "PWM" at 123.406,71.339 h0.4 r90
  text "--" at 101.85,70.45 h0.8
  text "e" at 119.523,70.236 h5
Top Solder:
  rectangle: 138.25,70.5 141.5,78.25
  rectangle: 130.25,70.5 133.5,78.25
  rectangle: 122.25,70.5 125.5,78.25
  rectangle: 100.5,70.5 141.5,74.5
  lines w4: 100.362,97.458 118.302,97.458 136.938,97.458

## Dimensions
146,100 to 146,70 on Layer 1
95,99 to 147,99 on Layer 1